# Altium PCB LSS-P-PCB-T v3.4.PcbDoc (part 2 of 6)
Units mil, origin at the board's own origin, x right, y up, seen from the top; angles counter-clockwise.
Board outline 2795.28 x 2795.28 mil, 4 copper layers (Top Layer, Power, Ground, Bottom Layer), stack 62.08 mil thick; 165 components, 120 nets, 586 pads, 623 vias.
Unrouted connection lines stored in the file: 2.
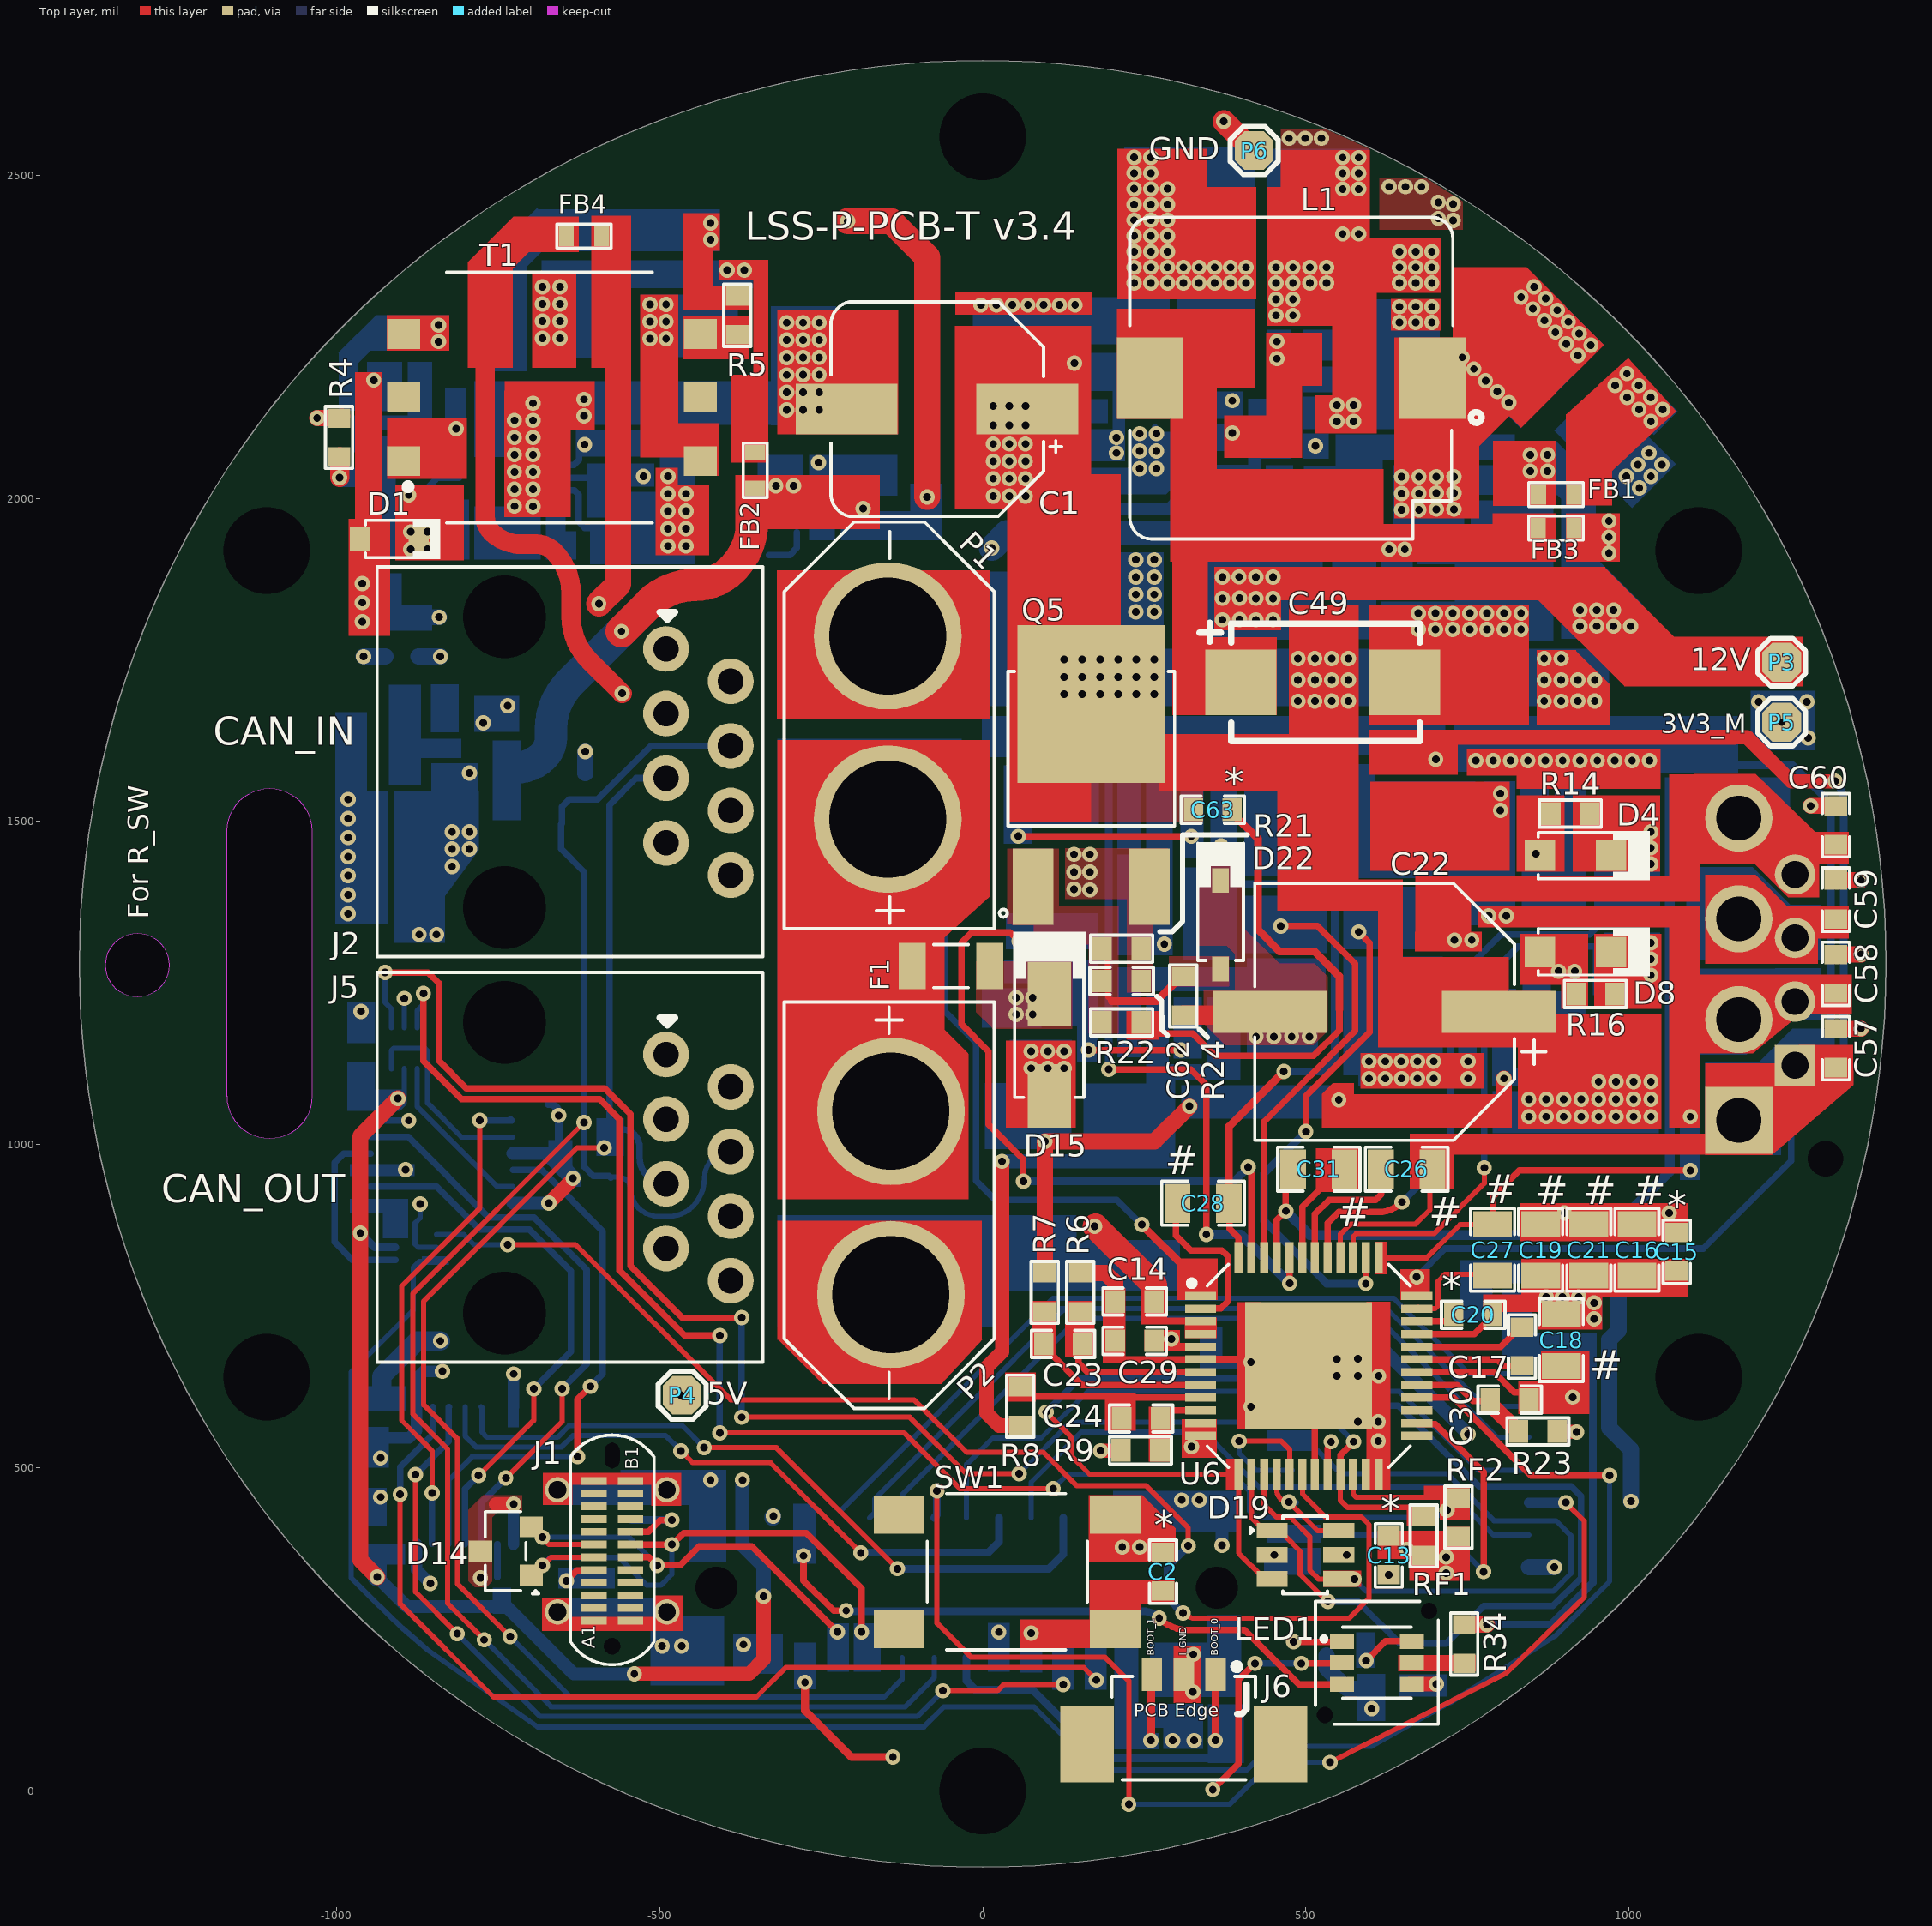
[diagram p0: Top Layer view]

## Part data (continued)
C30: library part UMK107B7474KA-TR, "CAP CER 0.47uF 50V X7R 0603", Capacitance=470nF, Case Code (Imperial)=0603, Case Code (Metric)=1608, Dielectric=X7R, Manufacturer="Taiyo Yuden", Max Operating Temperature=125°C, Min Operating Temperature=-55°C, Package Quantity=1, Supplier Part Number 1=587-3170-1-ND, Tolerance=10%, Voltage=50V, Case/Package=0603, Category="Ceramic Capacitors", ComponentLink1Description=https://datasheet.ciiva.com/30063/972umk107b7474ka-tr-30063804.pdf?src-supplier=Onlinecomponents.com, ComponentLink1URL=https://datasheet.ciiva.com/30063/972umk107b7474ka-tr-30063804.pdf?src-supplier=Onlinecomponents.com, ComponentLink2Description=https://datasheet.ciiva.com/11600/umk107b7474ka-tr-ss-11600367.pdf?src-supplier=Avnet, ComponentLink2URL=https://datasheet.ciiva.com/11600/umk107b7474ka-tr-ss-11600367.pdf?src-supplier=Avnet, ComponentLink3Description=https://datasheet.ciiva.com/15922/257umk107b7474ka-tr-15922607.pdf?src-supplier=Onlinecomponents.com, ComponentLink3URL=https://datasheet.ciiva.com/15922/257umk107b7474ka-tr-15922607.pdf?src-supplier=Onlinecomponents.com, ComponentLink4Description=https://datasheet.ciiva.com/6274/mlcc-all-e-6274710.pdf?src-supplier=Digi-Key, ComponentLink4URL=https://datasheet.ciiva.com/6274/mlcc-all-e-6274710.pdf?src-supplier=Digi-Key, ComponentLink5Description=https://datasheet.ciiva.com/5412/mlcc01-e-5412119.pdf?src-supplier=Mouser, ComponentLink5URL=https://datasheet.ciiva.com/5412/mlcc01-e-5412119.pdf?src-supplier=Mouser, ComponentLink6Description=https://datasheet.ciiva.com/6274/mlcc-all-e-6274712.pdf?src-supplier=Digi-Key, ComponentLink6URL=https://datasheet.ciiva.com/6274/mlcc-all-e-6274712.pdf?src-supplier=Digi-Key, ComponentLink7Description=https://datasheet.ciiva.com/6274/mlcc-all-e-6274713.pdf?src-supplier=Digi-Key, ComponentLink7URL=https://datasheet.ciiva.com/6274/mlcc-all-e-6274713.pdf?src-supplier=Digi-Key, Construction=Flat, Depth=0.8mm, Halogen Free="Halogen Free", Height=0.8mm, Lead Free="Lead Free", Length=1.6mm, Manufacturer Part Number=UMK107B7474KA-TR, Mount="Surface Mount", Packaging="Tape and Reel", Pricing 1="1=0.21000, 10=0.14800, 50=0.08400, 100=0.06950, 500=0.04876, 1000=0.04036 (USD)", Radiation Hardening=No, RoHS=Yes, RoHS Compliant=Yes, Series=M, Stock 1=81, Supplier 1=Digi-Key, Termination=SMD/SMT, Thickness=0.035inch, Voltage Rating=50V, Voltage Rating (DC)=50V, Width=0.031inch
C32: library part CL05B104KB54PNC, "CAP CER 0.1UF 50V X7R 0402", Manufacturer=Samsung, Supplier Part Number 1=1276-CL05B104KB54PNCDKR-ND, Manufacturer Part Number=CL05B104KB54PNC, Pricing 1="1=0.1, 10=0.067, 50=0.0366, 100=0.0299, 500=0.02138, 1000=0.01681, 2500=0.01528, 5000=0.01406 (USD)", Stock 1=8594, Supplier 1=Digi-Key
C33: library part CL10A475KA8NQNC, "CAP CER 4.7UF 25V X5R 0603", Capacitance=4.7uF, Case Code (Imperial)=0603, Case Code (Metric)=1608, Dielectric=X5R, Manufacturer=Samsung, Max Operating Temperature=85°C, Min Operating Temperature=-55°C, Package Quantity=1, Supplier Part Number 1=1276-1900-1-ND, Tolerance=10%, Voltage Rating=25V, Case/Package=0603, ComponentLink1Description=http://www.samsungsem.com/kr/support/product-search/mlcc/CL10A475KA8NQNC.jsp?src-supplier=Digi-Key, ComponentLink1URL=http://www.samsungsem.com/kr/support/product-search/mlcc/CL10A475KA8NQNC.jsp?src-supplier=Digi-Key, Contact Plating=Tin, Depth=0.8mm, Lead Free="Lead Free", Length=1.6mm, Manufacturer Part Number=CL10A475KA8NQNC, Mount="Surface Mount", Packaging="Tape and Reel", Pricing 1="1=0.37, 10=0.255, 100=0.1528, 500=0.11456, 1000=0.09675 (USD)", Stock 1=2252340, Supplier 1=Digi-Key, Termination=Wraparound, Thickness=0.035inch, Width=0.031inch
C36: library part 885012205080, "CAP CER 1000PF 100V X7R 0402", Manufacturer="Wurth Electronics", Supplier Part Number 1=732-12243-1-ND, ComponentLink1Description=https://katalog.we-online.de/pbs/datasheet/885012205080.pdf?src-supplier=Digi-Key, ComponentLink1URL=https://katalog.we-online.de/pbs/datasheet/885012205080.pdf?src-supplier=Digi-Key, Manufacturer Part Number=885012205080, Pricing 1="1=0.10000, 10=0.01900, 100=0.01730, 500=0.01532 (USD)", RoHS=Yes, Stock 1=13604, Supplier 1=Digi-Key
C37: library part CC0603KRX7R9BB222, "CAP CER 2200PF 50V X7R 0603", Case Code (Imperial)=0603, Case Code (Metric)=1608, Dielectric=X7R, Insulation Resistance=10GR, Manufacturer=Yageo, Max Operating Temperature=125°C, Min Operating Temperature=-55°C, Package Quantity=1, Resistor Type=Ceramic, Supplier Part Number 1=6169509, Tolerance=10%, Voltage=50V, Capacitance=2.2nF, Case/Package=0603, Category="Ceramic Capacitors", ComponentLink1Description=https://datasheet.ciiva.com/23768/1079489-23768004.pdf?src-supplier=Newark, ComponentLink1URL=https://datasheet.ciiva.com/23768/1079489-23768004.pdf?src-supplier=Newark, ComponentLink2Description=https://datasheet.ciiva.com/11788/0900766b8079c870-11788403.pdf?src-supplier=RSComponents, ComponentLink2URL=https://datasheet.ciiva.com/11788/0900766b8079c870-11788403.pdf?src-supplier=RSComponents, ComponentLink3Description=https://datasheet.ciiva.com/26862/getdatasheetpartid-403587-26862854.pdf?src-supplier=Verical, ComponentLink3URL=https://datasheet.ciiva.com/26862/getdatasheetpartid-403587-26862854.pdf?src-supplier=Verical, ComponentLink4Description=https://datasheet.ciiva.com/8033/70765-8033863.pdf?src-supplier=Element14, ComponentLink4URL=https://datasheet.ciiva.com/8033/70765-8033863.pdf?src-supplier=Element14, ComponentLink5Description=https://datasheet.ciiva.com/7978/1489800-7978172.pdf?src-supplier=Element14, ComponentLink5URL=https://datasheet.ciiva.com/7978/1489800-7978172.pdf?src-supplier=Element14, ComponentLink6Description=https://datasheet.ciiva.com/28450/1489800-28450632.pdf?src-supplier=Element14, ComponentLink6URL=https://datasheet.ciiva.com/28450/1489800-28450632.pdf?src-supplier=Element14, ComponentLink7Description=https://datasheet.ciiva.com/155/mlccorderingcode-155921.pdf?src-supplier=Digi-Key, ComponentLink7URL=https://datasheet.ciiva.com/155/mlccorderingcode-155921.pdf?src-supplier=Digi-Key, ComponentLink8Description=https://datasheet.ciiva.com/155/mlccorderingcode-155920.pdf?src-supplier=Digi-Key, ComponentLink8URL=https://datasheet.ciiva.com/155/mlccorderingcode-155920.pdf?src-supplier=Digi-Key, ComponentLink9Description=https://datasheet.ciiva.com/155/mlccorderingcode-155922.pdf?src-supplier=Digi-Key, ComponentLink9URL=https://datasheet.ciiva.com/155/mlccorderingcode-155922.pdf?src-supplier=Digi-Key, ComponentLink10Description=https://datasheet.ciiva.com/8033/1489800-8033864.pdf?src-supplier=Element14, ComponentLink10URL=https://datasheet.ciiva.com/8033/1489800-8033864.pdf?src-supplier=Element14, ComponentLink11Description=https://datasheet.ciiva.com/8033/1489800-8033862.pdf?src-supplier=Element14, ComponentLink11URL=https://datasheet.ciiva.com/8033/1489800-8033862.pdf?src-supplier=Element14, ComponentLink12Description=https://datasheet.ciiva.com/16625/upy-gphc-x7r-6-3v-to-50v-8-16625531.pdf?src-supplier=Avnet+Europe, ComponentLink12URL=https://datasheet.ciiva.com/16625/upy-gphc-x7r-6-3v-to-50v-8-16625531.pdf?src-supplier=Avnet+Europe, Depth=0.8mm, Dissipation Factor=2.5%, Halogen Free="Halogen Free", Height=0.8mm, Lead Free="Lead Free", Length=1.6mm, Manufacturer Part Number=CC0603KRX7R9BB222, Mount="Surface Mount", Number of Pins=2, Packaging="Tape and Reel", Pricing 1="4000=0.00500 (USD)", Radiation Hardening=No, REACH SVHC="No SVHC", RoHS=Yes, RoHS Compliant=Yes, Series=CC, Stock 1=1, Supplier 1=RSComponents, Termination=SMD/SMT, Thickness=0.035inch, Voltage Rating=50V, Voltage Rating (DC)=50V, Width=0.031inch
C38: library part GRM155R62A104KE14D, "CAP CER 0.1UF 100V X5R 0402", Capacitance=100nF, Case Code (Imperial)=0402, Case Code (Metric)=1005, Dielectric=X5R, LCSC Part Number=C162178, Manufacturer=Murata, Max Operating Temperature=85°C, Min Operating Temperature=-55°C, Package Quantity=10000, Tolerance=10%, Voltage Rating=100V, Case/Package=0402, Category="Ceramic Capacitors", ComponentLink1Description=http://www.farnell.com/datasheets/2079151.pdf?src-supplier=Farnell, ComponentLink1URL=http://www.farnell.com/datasheets/2079151.pdf?src-supplier=Farnell, ComponentLink2Description=http://www.mouser.com/ds/2/281/c02e-2905.pdf?src-supplier=Mouser, ComponentLink2URL=http://www.mouser.com/ds/2/281/c02e-2905.pdf?src-supplier=Mouser, ComponentLink3Description=http://www.farnell.com/datasheets/2079151.pdf?src-supplier=Element14, ComponentLink3URL=http://www.farnell.com/datasheets/2079151.pdf?src-supplier=Element14, ComponentLink4Description=http://search.murata.co.jp/Ceramy/image/img/A01X/G101/ENG/GRM155R62A104KE14-01.pdf?src-supplier=Digi-Key, ComponentLink4URL=http://search.murata.co.jp/Ceramy/image/img/A01X/G101/ENG/GRM155R62A104KE14-01.pdf?src-supplier=Digi-Key, ComponentLink5Description=http://www.farnell.com/datasheets/2079151.pdf?src-supplier=Newark, ComponentLink5URL=http://www.farnell.com/datasheets/2079151.pdf?src-supplier=Newark, Height=0.5mm, Item Type=Capacitor, Lead Free="Lead Free", Length=0.039inch, Manufacturer Part Number=GRM155R62A104KE14D, Mount="Surface Mount", Packaging="Tape and Reel", Pricing 1="10000=0.00500, 20000=0.00410, 30000=0.00390, 50000=0.00370, 100000=0.00300 (USD)", Reach SVHC Compliant=Yes, RoHS=Yes, RoHS Compliant=Yes, Series=GRM, Stock 1=870000, Supplier 1="Arrow Electronics", Supplier Part Number 1=GRM155R62A104KE14D, Termination=SMD/SMT, Thickness=0.022inch, Voltage Rating (DC)=100V, Weight=0.000212oz, Width=0.02inch
C39: library part C1608X5R1E106M080AC, "CAP CER 10UF 25V X5R 0603", Case Code (Imperial)=0603, Case Code (Metric)=1608, Dielectric=X5R, Dielectric Material=Ceramic, LCSC Part Number=C2168289, Manufacturer=TDK, Max Operating Temperature=85°C, Min Operating Temperature=-55°C, Package Quantity=1, Supplier Part Number 1=445-9015-1-ND, Tolerance=20%, Voltage Rating=25V, Capacitance=10uF, Case/Package=0603, Composition=Ceramic, Depth=0.8mm, Height=0.8mm, Item Type=Capacitor, Lead Free="Lead Free", Length=1.6mm, Manufacturer Part Number=C1608X5R1E106M080AC, Mount="Surface Mount", Packaging="Tape and Reel", Pricing 1="1=0.96, 10=0.704, 100=0.483, 500=0.38238, 1000=0.322 (USD)", REACH SVHC="No SVHC", Stock 1=61681, Supplier 1=Digi-Key, Termination=SMD/SMT, Thickness=0.039inch, Voltage Rating (DC)=25V, Weight=7.1E-05oz, Width=0.8mm
C42: library part 0603B682K500NT, "50V 6.8nF X7R ±10% 0603", Manufacturer=FH, ComponentLink1Description=LCSC, ComponentLink1URL=https://www.lcsc.com/product-detail/Multilayer-Ceramic-Capacitors-MLCC-SMD-SMT_FH-Guangdong-Fenghua-Advanced-Tech-0603B682K500NT_C1631.html, Manufacturer Part Number=0603B682K500NT
C43: library part GRM31CR61E476ME44L, "CAP CER 1206 47 uF 25 V ±20 % Tol. X5R", Dielectric=X5R, Manufacturer=Murata, Supplier Part Number 1=490-16268-2-ND, Tolerance=20%, Voltage Rating (DC)=25V, Capacitance=47uF, Category="Ceramic Capacitors", ComponentLink1Description=https://search.murata.co.jp/Ceramy/image/img/A01X/partnumbering_e_01.pdf?src-supplier=Digi-Key, ComponentLink1URL=https://search.murata.co.jp/Ceramy/image/img/A01X/partnumbering_e_01.pdf?src-supplier=Digi-Key, Length=3.2mm, Manufacturer Part Number=GRM31CR61E476ME44L, RoHS=Yes, Supplier 1=Digi-Key, Thickness=1.6mm, Width=1.6mm
C44 C45: library part C2012X5R1V226MT000E, "CAP CER 22UF 35V X5R 0805", LCSC Part Number=C338080, Manufacturer="TDK Corporation", Package=0805, ComponentLink1Description=LCSC, ComponentLink1URL=https://www.lcsc.com/product-detail/Multilayer-Ceramic-Capacitors-MLCC-SMD-SMT_TDK-C2012X5R1V226M125AC_C2179409.html, Item Type=Capacitor, Manufacturer Part Number=C2012X5R1V226MT000E
C48 C49: library part TAJE107M025RNJ, "CAP TANT 100UF 20% 25V 2917", Case Code (Imperial)=2917, Case Code (Metric)=7343, ESR (Equivalent Series Resistance)=300mR, Leakage Current=25uA, Manufacturer="Kyocera AVX", Max Operating Temperature=125°C, Min Operating Temperature=-55°C, Package Quantity=1, Supplier Part Number 1=581-TAJE107M025RNJ, Tolerance=20%, Voltage Rating=25V, Capacitance=100uF, Case/Package=2917, Category="Tantalum Capacitors", ComponentLink1Description=https://datasheet.ciiva.com/26787/taje107m025rnj-26787048.pdf?src-supplier=IIIC, ComponentLink1URL=https://datasheet.ciiva.com/26787/taje107m025rnj-26787048.pdf?src-supplier=IIIC, ComponentLink2Description=https://datasheet.ciiva.com/265/taj-265541.pdf?src-supplier=Digi-Key, ComponentLink2URL=https://datasheet.ciiva.com/265/taj-265541.pdf?src-supplier=Digi-Key, ComponentLink3Description=https://datasheet.ciiva.com/265/taj-265542.pdf?src-supplier=Digi-Key, ComponentLink3URL=https://datasheet.ciiva.com/265/taj-265542.pdf?src-supplier=Digi-Key, ComponentLink4Description=https://datasheet.ciiva.com/265/taj-265540.pdf?src-supplier=Digi-Key, ComponentLink4URL=https://datasheet.ciiva.com/265/taj-265540.pdf?src-supplier=Digi-Key, ComponentLink5Description=https://datasheet.ciiva.com/28609/1719052-28609254.pdf?src-supplier=Element14, ComponentLink5URL=https://datasheet.ciiva.com/28609/1719052-28609254.pdf?src-supplier=Element14, ComponentLink6Description=https://datasheet.ciiva.com/11230/taj-11230456.pdf?src-supplier=Avnet, ComponentLink6URL=https://datasheet.ciiva.com/11230/taj-11230456.pdf?src-supplier=Avnet, ComponentLink7Description=https://datasheet.ciiva.com/17339/taj-17339677.pdf?src-supplier=Avnet+Europe, ComponentLink7URL=https://datasheet.ciiva.com/17339/taj-17339677.pdf?src-supplier=Avnet+Europe, ComponentLink8Description=https://datasheet.ciiva.com/22667/1719052-22667581.pdf?src-supplier=Element14, ComponentLink8URL=https://datasheet.ciiva.com/22667/1719052-22667581.pdf?src-supplier=Element14, Construction=Flat, Depth=4.3mm, Dissipation Factor=10%, Features="General Purpose", Height=4.3mm, Height - Seated (Max)=0.169inch, Lead Free="Lead Free", Length=7.3mm, Manufacturer Part Number=TAJE107M025RNJ, Mount="Surface Mount", Number of Pins=2, Packaging="Tape and Reel", Polarity=Polar, Pricing 1="1=2.81000, 10=2.81000, 50=2.81000, 100=2.19000, 1000=1.76000, 10000=1.76000 (USD)", Radiation Hardening=No, REACH SVHC="No SVHC", RoHS=Yes, RoHS Compliant=Yes, Series=TAJ, Stock 1=109, Supplier 1=Mouser, Termination=SMD/SMT, Voltage Rating (DC)=25V, Width=4.3mm
C50: library part CC0603KRX7R9BB471, "CAP CER 470pF 10% X7R 50V 0603 SMD", Case Code (Imperial)=0603, Case Code (Metric)=1608, Dielectric=X7R, Dielectric Material=Ceramic, Insulation Resistance=10GR, Manufacturer=Yageo, Max Operating Temperature=125°C, Min Operating Temperature=-55°C, Package Quantity=1, Supplier Part Number 1=311-1078-1-ND, Tolerance=10%, Voltage Rating=50V, Capacitance=470pF, Case/Package=0603, Category="Ceramic Capacitors", ComponentLink1Description=https://datasheet.ciiva.com/5425/upy-gphc-x7r-6-3v-to-50v-8-12304-5425461.pdf?src-supplier=Mouser, ComponentLink1URL=https://datasheet.ciiva.com/5425/upy-gphc-x7r-6-3v-to-50v-8-12304-5425461.pdf?src-supplier=Mouser, ComponentLink2Description=https://datasheet.ciiva.com/144/mlccorderingcode-144439.pdf?src-supplier=Digi-Key, ComponentLink2URL=https://datasheet.ciiva.com/144/mlccorderingcode-144439.pdf?src-supplier=Digi-Key, ComponentLink3Description=https://datasheet.ciiva.com/144/mlccorderingcode-144440.pdf?src-supplier=Digi-Key, ComponentLink3URL=https://datasheet.ciiva.com/144/mlccorderingcode-144440.pdf?src-supplier=Digi-Key, ComponentLink4Description=https://datasheet.ciiva.com/11587/upy-gphc-x7r-6-3v-to-50v-8-11587224.pdf?src-supplier=Avnet, ComponentLink4URL=https://datasheet.ciiva.com/11587/upy-gphc-x7r-6-3v-to-50v-8-11587224.pdf?src-supplier=Avnet, ComponentLink5Description=https://datasheet.ciiva.com/144/mlccorderingcode-144441.pdf?src-supplier=Digi-Key, ComponentLink5URL=https://datasheet.ciiva.com/144/mlccorderingcode-144441.pdf?src-supplier=Digi-Key, ComponentLink6Description=https://datasheet.ciiva.com/16623/upy-gphc-x7r-6-3v-to-50v-8-16623897.pdf?src-supplier=Avnet+Europe, ComponentLink6URL=https://datasheet.ciiva.com/16623/upy-gphc-x7r-6-3v-to-50v-8-16623897.pdf?src-supplier=Avnet+Europe, ComponentLink7Description=https://datasheet.ciiva.com/8033/1489800-8033898.pdf?src-supplier=Element14, ComponentLink7URL=https://datasheet.ciiva.com/8033/1489800-8033898.pdf?src-supplier=Element14, ComponentLink8Description=https://datasheet.ciiva.com/8033/1489800-8033899.pdf?src-supplier=Element14, ComponentLink8URL=https://datasheet.ciiva.com/8033/1489800-8033899.pdf?src-supplier=Element14, ComponentLink9Description=https://datasheet.ciiva.com/26829/getdatasheetpartid-251791-26829452.pdf?src-supplier=Verical, ComponentLink9URL=https://datasheet.ciiva.com/26829/getdatasheetpartid-251791-26829452.pdf?src-supplier=Verical, ComponentLink10Description=https://datasheet.ciiva.com/28450/1489800-28450652.pdf?src-supplier=Element14, ComponentLink10URL=https://datasheet.ciiva.com/28450/1489800-28450652.pdf?src-supplier=Element14, ComponentLink11Description=https://datasheet.ciiva.com/8033/70765-8033902.pdf?src-supplier=Element14, ComponentLink11URL=https://datasheet.ciiva.com/8033/70765-8033902.pdf?src-supplier=Element14, Depth=0.8mm, Dissipation Factor=2.5%, Halogen Free="Halogen Free", Height=0.8mm, Lead Free="Lead Free", Length=1.6mm, Manufacturer Part Number=CC0603KRX7R9BB471, Mount="Surface Mount", Number of Pins=2, Packaging="Tape and Reel", Pricing 1="1=0.10000, 10=0.04500, 50=0.02460, 100=0.02010, 500=0.01432, 1000=0.01125 (USD)", Radiation Hardening=No, REACH SVHC="No SVHC", Resistor Type=Ceramic, RoHS=Yes, RoHS Compliant=Yes, Series=CC, Stock 1=2173, Supplier 1=Digi-Key, Termination=SMD/SMT, Thickness=0.035inch, Voltage Rating (DC)=50V, Width=0.8mm
C57 C58 C59 C60: library part CL10B102KC8NNNC, "CAP CER 1nF 100V X7R 0603", Case Code (Imperial)=0603, Case Code (Metric)=1608, Dielectric=X7R, Manufacturer=Samsung, Max Operating Temperature=125°C, Min Operating Temperature=-55°C, Package Quantity=1, Tolerance=10%, Voltage=100V, Capacitance=1nF, Case/Package=0603, Category="Ceramic Capacitors", ComponentLink1Description=https://datasheet.ciiva.com/25799/cl10b102kc8nnnc-25799476.pdf?src-supplier=Digi-Key, ComponentLink1URL=https://datasheet.ciiva.com/25799/cl10b102kc8nnnc-25799476.pdf?src-supplier=Digi-Key, ComponentLink2Description=https://datasheet.ciiva.com/29198/458286-da-01-en-vs-kondensator-0603-29198496.pdf?src-supplier=Conrad, ComponentLink2URL=https://datasheet.ciiva.com/29198/458286-da-01-en-vs-kondensator-0603-29198496.pdf?src-supplier=Conrad, ComponentLink3Description=https://datasheet.ciiva.com/26838/getdatasheetpartid-640779-26838395.pdf?src-supplier=Verical, ComponentLink3URL=https://datasheet.ciiva.com/26838/getdatasheetpartid-640779-26838395.pdf?src-supplier=Verical, ComponentLink4Description=https://datasheet.ciiva.com/26310/mlcc-catalogdownload2013-eng-26310266.pdf?src-supplier=Distrelec, ComponentLink4URL=https://datasheet.ciiva.com/26310/mlcc-catalogdownload2013-eng-26310266.pdf?src-supplier=Distrelec, ComponentLink5Description=https://datasheet.ciiva.com/16199/cl05b104kq5nnnc-16199246.pdf?src-supplier=Future+Electronics, ComponentLink5URL=https://datasheet.ciiva.com/16199/cl05b104kq5nnnc-16199246.pdf?src-supplier=Future+Electronics, Construction=Flat, Contact Plating=Tin, Depth=0.8mm, Height=0.8mm, Lead Free="Lead Free", Length=1.6mm, Manufacturer Part Number=CL10B102KC8NNNC, Material=Ceramic, Mount="Surface Mount", Packaging="Tape and Reel", Pricing 1="4000=0.00988, 8000=0.00987, 16000=0.00986, 24000=0.00985, 32000=0.00984, 40000=0.00982, 400000=0.00981 (USD)", Radiation Hardening=No, RoHS=Yes, RoHS Compliant=Yes, Series=CL, Stock 1=184000, Supplier 1=Avnet, Supplier Part Number 1=CL10B102KC8NNNC, Thickness=0.035inch, Voltage Rating=100V, Voltage Rating (DC)=100V, Width=0.031inch
D1: "Diode Schottky 30V 1A Surface Mount USC", Average Rectified Current=1A, Case/Package=SOD, Manufacturer=Toshiba, Max Operating Temperature=125°C, Max Reverse Current=500uA, Max Reverse Voltage (DC)=30V, Min Operating Temperature=-55°C, Peak Non-Repetitive Surge Current=5A, Category="Rectifier Diodes", ComponentLink1Description=https://toshiba.semicon-storage.com/info/docget.jsp?did=14077&prodName=CUS10S30&src-supplier=Digi-Key, ComponentLink1URL=https://toshiba.semicon-storage.com/info/docget.jsp?did=14077&prodName=CUS10S30&src-supplier=Digi-Key, ComponentLink2Description=http://toshiba.semicon-storage.com/info/docget.jsp?did=14077&prodName=CUS10S30&src-supplier=Avnet, ComponentLink2URL=http://toshiba.semicon-storage.com/info/docget.jsp?did=14077&prodName=CUS10S30&src-supplier=Avnet, ComponentLink3Description=http://toshiba.semicon-storage.com/info/lookup.jsp?pid=CUS10S30&amp;lang=en&src-supplier=Mouser, ComponentLink3URL=http://toshiba.semicon-storage.com/info/lookup.jsp?pid=CUS10S30&amp;lang=en&src-supplier=Mouser, Contact Plating=Tin,Silver, Element Configuration=Single, Manufacturer Part Number=CUS10S30,H3F, Mount="Surface Mount", Number of Pins=2, Packaging="Cut Tape", Pricing 1="3000=0.04896, 6000=0.04768, 12000=0.04544, 18000=0.04416, 24000=0.04320, 30000=0.04192, 300000=0.04096 (USD)", RoHS=Yes, RoHS Compliant=No, Stock 1=9000, Supplier 1=Avnet, Supplier Part Number 1=CUS10S30,H3F
D2: "500μA@100V 100V Single 600mV@1A 1A SMA Schottky Barrier Diodes (SBD) ROHS", Manufacturer=Yangzhou, Package=SMA, Manufacturer Part No=SSL110A
D3 DF2: "40V 500mV@2A 2A SMA(DO-214AC) Schottky Barrier Diodes (SBD) ROHS", Manufacturer=Yangzhou, Package=SMA(DO-214AC), Manufacturer Part No=SS24A
D4 D5 D6 D7 D8 D9 D10 D11: "DIODE SCHOTTKY 30V 1A SOD123F", Manufacturer=TOSHIBA, Manufacturer Part Number=CRS01(TE85L,Q,M), Stock 1=72983, Supplier 1=Digi-Key
D12 D13: "TVS DIODE 24VWM 41VC TO236AB", Manufacturer=Nexperia, Category="ESD and Circuit Protection ICs", ComponentLink1Description=http://www.farnell.com/datasheets/1750978.pdf?src-supplier=Farnell, ComponentLink1URL=http://www.farnell.com/datasheets/1750978.pdf?src-supplier=Farnell, ComponentLink2Description=https://assets.nexperia.com/documents/data-sheet/PESD2CAN.pdf?src-supplier=Digi-Key, ComponentLink2URL=https://assets.nexperia.com/documents/data-sheet/PESD2CAN.pdf?src-supplier=Digi-Key, ComponentLink3Description=http://www.farnell.com/datasheets/1750978.pdf?src-supplier=Newark, ComponentLink3URL=http://www.farnell.com/datasheets/1750978.pdf?src-supplier=Newark, Manufacturer Part Number=PESD2CAN,215, Pricing 1="1=0.48690, 10=0.40120, 25=0.38650, 50=0.33780, 100=0.25440, 250=0.25380, 500=0.25120 (USD)", RoHS=No, Stock 1=775, Supplier 1="Arrow Electronics", Supplier Part Number 1=PESD2CAN,215
D14: "16A 20V 7V 5V@Max Unidirectional SOT-23 TVS ROHS", LCSC Part Number=C239643, Manufacturer=WILLSEMI, Package=SOT-23, ComponentLink1Description=LCSC, ComponentLink1URL=https://www.lcsc.com/product-detail/TVS_WILLSEMI-Will-Semicon-ESD5302F-3-TR_C239643.html, Item Type=Diode, Manufacturer Part Number=ESD5302F-3/TR
D15: "TVS DIODE 48VWM 77.4VC DO214AC", Breakdown Voltage=53.3V, Case/Package=DO-214AC, Clamping Voltage=77.4V, LCSC Part Number=C223991, Leakage Current=1uA, Manufacturer=Littelfuse, Max Breakdown Voltage=58.9V, Max Operating Temperature=150°C, Max Power Dissipation=3.3W, Max Surge Current=5.2A, Min Operating Temperature=-65°C, Operating Supply Voltage=48V, Package=SMA(DO-214AC), Package Quantity=5000, Peak Pulse Power=400W, Power Line Protection=No, Supplier Part Number=1719659, Test Current=1mA, Category="TVS Diodes", Clamping Voltage-Max=77.4V, ComponentLink1Description=LCSC, ComponentLink2Description=https://datasheet.ciiva.com/28649/607617-28649159.pdf?src-supplier=Element14, ComponentLink2URL=https://datasheet.ciiva.com/28649/607617-28649159.pdf?src-supplier=Element14, ComponentLink3Description=https://datasheet.ciiva.com/16391/littelfuse-tvs-diode-smaj-16391798.pdf?src-supplier=Future+Electronics, ComponentLink3URL=https://datasheet.ciiva.com/16391/littelfuse-tvs-diode-smaj-16391798.pdf?src-supplier=Future+Electronics, ComponentLink4Description=https://datasheet.ciiva.com/330/littelfuse-tvs-diode-smaj-datasheet-pdf-330802.pdf?src-supplier=Digi-Key, ComponentLink4URL=https://datasheet.ciiva.com/330/littelfuse-tvs-diode-smaj-datasheet-pdf-330802.pdf?src-supplier=Digi-Key, ComponentLink5Description=https://datasheet.ciiva.com/330/littelfuse-tvs-diode-smaj-datasheet-pdf-330803.pdf?src-supplier=Digi-Key, ComponentLink5URL=https://datasheet.ciiva.com/330/littelfuse-tvs-diode-smaj-datasheet-pdf-330803.pdf?src-supplier=Digi-Key, ComponentLink6Description=https://datasheet.ciiva.com/330/littelfuse-tvs-diode-smaj-datasheet-pdf-330804.pdf?src-supplier=Digi-Key, ComponentLink6URL=https://datasheet.ciiva.com/330/littelfuse-tvs-diode-smaj-datasheet-pdf-330804.pdf?src-supplier=Digi-Key, Diode Type=ZENER, Direction=Unidirectional, Height=2.29mm, Item Type="TVS  Diode", Lead Free="Lead Free", Length=5.28mm, Manufacturer Part Number=SMAJ48A, Min Breakdown Voltage=53.3V, Mounting Technology="Surface Mount", Number of Channels=1, Number of Elements=1, Number of Unidirectional Channels=1, Packaging="Tape and Reel", Peak Pulse Current=5.2A, Pins=2, Polarity=Unidirectional, Power Dissipation=400W, Pricing="25=0.231, 100=0.214, 500=0.209, 1000=0.204 (GBP)", Reach SVHC Compliant=No, Reverse Breakdown Voltage=53.3V, Reverse Standoff Voltage=48V, RoHS=Yes, RoHS Compliant=Yes, Series=SMAJ, Stock=2975, Supplier=Rs, Termination=SMD/SMT, Voltage Rating (DC)=48V, Width=2.79mm
D16 D18: "TVS DIODE 3.3VWM 11.5VC MICROSMP", Breakdown Voltage=4.1V, Clamping Voltage=11V, LCSC Part Number=C241899, Max Operating Temperature=150°C, Max Reverse Leakage Current=200uA, Max Surge Current=75A, Min Operating Temperature=-55°C, Operating Supply Voltage=3.3V, Package Quantity=4500, Peak Pulse Current=87A, Peak Pulse Power=150W, Power Line Protection=No, Supplier Part Number=625-MSP3V3HM3, Test Current=1mA, Category="TVS Diodes", ComponentLink1Description=LCSC, ComponentLink2Description=https://datasheet.ciiva.com/14080/msp3v3-14080471.pdf?src-supplier=Digi-Key, ComponentLink2URL=https://datasheet.ciiva.com/14080/msp3v3-14080471.pdf?src-supplier=Digi-Key, Diode Type=ZENER, Direction=Unidirectional, Item Type="TVS Diode", Min Breakdown Voltage=4.1V, Mounting Technology="Surface Mount", Number of Unidirectional Channels=1, Packaging="Tape and Reel", Polarity=Unidirectional, Pricing="1=0.39, 10=0.313, 50=0.313, 100=0.165, 1000=0.068, 10000=0.05 (USD)", Reverse Standoff Voltage=3.3V, RoHS=Yes, RoHS Compliant=Yes, Series="Automotive, AEC-Q101, TransZorb®, eSMP™", Stock=15021, Supplier=Mouser
D17: "TVS DIODE 12VWM 19.9VC MICROSMP", LCSC Part Number=C1973858, Max Operating Temperature=150°C, Min Breakdown Voltage=13.3V, Min Operating Temperature=-55°C, Peak Pulse Current=7.5A, Peak Pulse Power=150W, Power Line Protection=No, Reverse Standoff Voltage=12V, Supplier Part Number=78-MSMP12A-M389A, Category="TVS Diodes", ComponentLink1Description=LCSC, ComponentLink2Description=http://www.vishay.com/docs/89457/mspm6a.pdf?src-supplier=Digi-Key, ComponentLink2URL=http://www.vishay.com/docs/89457/mspm6a.pdf?src-supplier=Digi-Key, ComponentLink3Description=http://www.vishay.com/docs/89457/msmp6athrumsmp20a.pdf?src-supplier=Digi-Key, ComponentLink3URL=http://www.vishay.com/docs/89457/msmp6athrumsmp20a.pdf?src-supplier=Digi-Key, Diode Type=ZENER, Item Type="TVS Diode", Mounting Technology="Surface Mount", Number of Unidirectional Channels=1, Packaging="Tape and Reel", Pricing="1=0.36, 10=0.294, 50=0.294, 100=0.118, 1000=0.069, 10000=0.048 (USD)", RoHS=Yes, RoHS Compliant=Yes, Series=TransZorb®, Stock=17037, Supplier=Mouser
D19: "TVS DIODE 5.25VWM 17VC SOT23-6", Breakdown Voltage=6V, Case/Package=SOT-23, Clamping Voltage=17V, LCSC Part Number=C111212, Leakage Current=150nA, Max Breakdown Voltage=10V, Max Operating Temperature=125°C, Max Reverse Leakage Current=2uA, Min Operating Temperature=-40°C, Operating Supply Voltage=860mV, Peak Pulse Current=5A, Power Line Protection=Yes, Reverse Standoff Voltage=5V, Supplier Part Number=511-USBLC6-4SC6, Test Current=1mA, Category="TVS Diodes", Clamping Voltage-Max=17V, ComponentLink1Description=LCSC, ComponentLink2Description=https://datasheet.ciiva.com/14186/usblc6-4-st-eng-tds-14186570.pdf?src-supplier=Distrelec, ComponentLink2URL=https://datasheet.ciiva.com/14186/usblc6-4-st-eng-tds-14186570.pdf?src-supplier=Distrelec, ComponentLink3Description=https://datasheet.ciiva.com/27052/1493951-27052291.pdf?src-supplier=Jameco, ComponentLink3URL=https://datasheet.ciiva.com/27052/1493951-27052291.pdf?src-supplier=Jameco, ComponentLink4Description=https://datasheet.ciiva.com/1220/48344-1220005.pdf?src-supplier=Newark, ComponentLink4URL=https://datasheet.ciiva.com/1220/48344-1220005.pdf?src-supplier=Newark, ComponentLink5Description=https://datasheet.ciiva.com/4507/cd00047494-112581-4507757.pdf?src-supplier=Mouser, ComponentLink5URL=https://datasheet.ciiva.com/4507/cd00047494-112581-4507757.pdf?src-supplier=Mouser, ComponentLink6Description=https://datasheet.ciiva.com/16206/cd00047494-16206119.pdf?src-supplier=Future+Electronics, ComponentLink6URL=https://datasheet.ciiva.com/16206/cd00047494-16206119.pdf?src-supplier=Future+Electronics, ComponentLink7Description=https://datasheet.ciiva.com/15143/getdatasheetpartid-88767-15143364.pdf?src-supplier=Verical, ComponentLink7URL=https://datasheet.ciiva.com/15143/getdatasheetpartid-88767-15143364.pdf?src-supplier=Verical, ComponentLink8Description=https://datasheet.ciiva.com/22685/1498406-22685833.pdf?src-supplier=Element14, ComponentLink8URL=https://datasheet.ciiva.com/22685/1498406-22685833.pdf?src-supplier=Element14, ComponentLink9Description=https://datasheet.ciiva.com/22692/1498406-22692454.pdf?src-supplier=Element14, ComponentLink9URL=https://datasheet.ciiva.com/22692/1498406-22692454.pdf?src-supplier=Element14, Depth=1.75mm, Direction=Unidirectional, ESD Protection=Yes, Height=1.3mm, Item Type="ESD Diode", Lead Free="Lead Free", Length=3.05mm, Min Breakdown Voltage=6V, Mounting Technology="Surface Mount", Number of Channels=4, Number of Elements=1, Number of Unidirectional Channels=4, Packaging="Tape and Reel", Pins=6, Polarity=Unidirectional,Bidirectional, Pricing="1=0.58, 10=0.512, 50=0.512, 100=0.381, 1000=0.271, 10000=0.211 (USD)", Radiation Hardening=No, Reach SVHC Compliant=No, Reverse Breakdown Voltage=6V, RoHS=Yes, RoHS Compliant=Yes, Series=USB, Stock=148069, Supplier=Mouser, Termination=SMD/SMT, Voltage Rating (DC)=5V, Width=1.75mm, Working Voltage=5V
D20 D21: "TVS DIODE 5.25VWM 17VC SOT666", Breakdown Voltage=6V, Case/Package=SOT-666, Clamping Voltage=17V, LCSC Part Number=C15999, Leakage Current=150nA, Max Operating Temperature=125°C, Max Repetitive Reverse Voltage (Vrrm)=5.25V, Min Operating Temperature=-40°C, Operating Supply Voltage=5V, Package Quantity=1, Peak Pulse Current=5A, Power Line Protection=Yes, Supplier Part Number=511-USBLC6-2P6, Test Current=1mA, Category="TVS Diodes", Clamping Voltage-Max=17V, ComponentLink1Description=LCSC, ComponentLink2Description=https://datasheet.ciiva.com/14186/usblc6-2-st-eng-tds-14186568.pdf?src-supplier=Distrelec, ComponentLink2URL=https://datasheet.ciiva.com/14186/usblc6-2-st-eng-tds-14186568.pdf?src-supplier=Distrelec, ComponentLink3Description=https://datasheet.ciiva.com/15143/getdatasheetpartid-98673-15143462.pdf?src-supplier=Verical, ComponentLink3URL=https://datasheet.ciiva.com/15143/getdatasheetpartid-98673-15143462.pdf?src-supplier=Verical, ComponentLink4Description=https://datasheet.ciiva.com/22685/1690354-22685832.pdf?src-supplier=Element14, ComponentLink4URL=https://datasheet.ciiva.com/22685/1690354-22685832.pdf?src-supplier=Element14, ComponentLink5Description=https://datasheet.ciiva.com/22692/1690354-22692453.pdf?src-supplier=Element14, ComponentLink5URL=https://datasheet.ciiva.com/22692/1690354-22692453.pdf?src-supplier=Element14, ComponentLink6Description=https://datasheet.ciiva.com/4508/cd00050750-4508892.pdf?src-supplier=Mouser, ComponentLink6URL=https://datasheet.ciiva.com/4508/cd00050750-4508892.pdf?src-supplier=Mouser, ComponentLink7Description=https://datasheet.ciiva.com/16378/cd00050750-16378714.pdf?src-supplier=Future+Electronics, ComponentLink7URL=https://datasheet.ciiva.com/16378/cd00050750-16378714.pdf?src-supplier=Future+Electronics, ComponentLink8Description=https://datasheet.ciiva.com/41444/001184108-da-01-en-ic-esd-protection-usblc6-2p6-sot-666-stm-41444134.pdf?src-supplier=Conrad, ComponentLink8URL=https://datasheet.ciiva.com/41444/001184108-da-01-en-ic-esd-protection-usblc6-2p6-sot-666-stm-41444134.pdf?src-supplier=Conrad, Depth=1.3mm, Direction=Unidirectional,Bidirectional, ESD Protection=Yes, Height=0.6mm, Item Type="ESD Diode", Lead Free="Lead Free", Length=1.7mm, Max Breakdown Voltage=6V, Max Reverse Leakage Current=150nA, Min Breakdown Voltage=6V, Mounting Technology="Surface Mount", Number of Bidirectional Channels=2, Number of Channels=2, Number of Elements=1, Number of Unidirectional Channels=2, Packaging="Tape and Reel", Pins=6, Polarity=Unidirectional,Bidirectional, Pricing="1=0.59, 10=0.514, 50=0.514, 100=0.356, 1000=0.253, 10000=0.197 (USD)", Radiation Hardening=No, Reach SVHC Compliant=No, Reverse Breakdown Voltage=6V, Reverse Standoff Voltage=5V, RoHS=Yes, RoHS Compliant=Yes, Series=USB, Stock=180020, Supplier=Mouser, Termination=SMD/SMT, Width=1.3mm, Working Voltage=5V
D22: "±5% Single 15.3V~17.1V 500mW 16V SOD-123 Zener Diodes ROHS", LCSC Part Number=C216724, Manufacturer=Shikues, Package=SOD-123, ComponentLink1Description=LCSC, ComponentLink1URL=https://www.lcsc.com/product-detail/Zener-Diodes_Shikues-BZT52C16_C216724.html, Item Type="Zener Diode", Manufacturer Part Number=BZT52C16
F1: "FUSE BOARD MNT 15A 125VAC 32VDC", Case Code (Imperial)=1206, Case Code (Metric)=3216, Current Rating=15A, DC Cold Resistance=2.6mR, Manufacturer=Bel, Max Operating Temperature=125°C, Min Operating Temperature=-55°C, Supplier Part Number 1=507-1944-1-ND, Voltage Rating (AC)=125V, Voltage Rating (DC)=32V, Approvals=cURus, Case/Package=1206, Category=Fuses, ComponentLink1Description=http://www.farnell.com/datasheets/2571626.pdf?src-supplier=Farnell, ComponentLink1URL=http://www.farnell.com/datasheets/2571626.pdf?src-supplier=Farnell, ComponentLink2Description=http://www.farnell.com/datasheets/2571626.pdf?src-supplier=Newark, ComponentLink2URL=http://www.farnell.com/datasheets/2571626.pdf?src-supplier=Newark, ComponentLink3Description=https://belfuse.com/resources/datasheets/circuitprotection/ds-cp-c1h-series.pdf?src-supplier=Digi-Key, ComponentLink3URL=https://belfuse.com/resources/datasheets/circuitprotection/ds-cp-c1h-series.pdf?src-supplier=Digi-Key, Fuse Type="Board Mount (Cartridge Style Excluded)", Manufacturer Part Number=0685H9150-01, Mount="Surface Mount", Packaging="Tape and Reel", Pricing 1="1=0.29000, 5=0.27800, 10=0.26600, 50=0.23780, 100=0.22140, 250=0.19680, 500=0.16400, 1000=0.15580 (USD)", RoHS=Yes, RoHS Compliant=Yes, Stock 1=31788, Supplier 1=Digi-Key
FB1 FB2 FB3 FB4: "Ferrite Beads Multi-Layer 120Ohm 25% 100MHz 2A 45mOhm DCR 0603 Automotive T/R", Case Code (Imperial)=0603, Case Code (Metric)=1608, DC Resistance (DCR)=45mR, Manufacturer=TDK, Max Current Rating=2A, Max Operating Temperature=125°C, Min Operating Temperature=-55°C, Package Quantity=4000, Ratings=AEC-Q200, Supplier Part Number 1=445-172891-6-ND, Test Frequency=100MHz, Tolerance=25%, Case/Package=0603, Category="Ferrite Beads and Chips", ComponentLink1Description=https://media.digikey.com/pdf/Data%20Sheets/TDK%20PDFs/MPZ_Series_Br.pdf?src-supplier=Digi-Key, ComponentLink1URL=https://media.digikey.com/pdf/Data%20Sheets/TDK%20PDFs/MPZ_Series_Br.pdf?src-supplier=Digi-Key, ComponentLink2Description=http://www.mouser.com/ds/2/400/eads_commercial_power_mpz1608_en-923650.pdf?src-supplier=Mouser, ComponentLink2URL=http://www.mouser.com/ds/2/400/eads_commercial_power_mpz1608_en-923650.pdf?src-supplier=Mouser, ComponentLink3Description=https://product.tdk.com/info/en/catalog/datasheets/beads_automotive_power_mpz1608_en.pdf?src-supplier=Digi-Key, ComponentLink3URL=https://product.tdk.com/info/en/catalog/datasheets/beads_automotive_power_mpz1608_en.pdf?src-supplier=Digi-Key, Height=0.03inch, Impedance=120R, Length=0.063inch, Manufacturer Part Number=MPZ1608S121ATDH5, Max DC Current=2A, Mount="Surface Mount", Number of Lines=1, Packaging="Tape and Reel", Pricing 1="1=0.11000, 10=0.08600, 25=0.07720, 50=0.05660, 100=0.04890, 250=0.03860, 500=0.03260, 1000=0.02746 (USD)", RoHS=Yes, RoHS Compliant=Yes, Supplier 1=Digi-Key, Termination=SMD/SMT, Weight=7.1E-05oz, Width=0.031inch
J1: "USB 3.0 3A 1 Brick nogging 24 Female -35℃~+75℃ Type-C SMD USB Connectors ROHS", Manufacturer=SOFNG, ComponentLink1Description=LCSC, ComponentLink1URL=https://www.lcsc.com/product-detail/USB-Connectors_SOFNG-MC-318FB_C2977724.html, Manufacturer Part Number=MC-318FB
J2 J5: "CONN MOD JACK 8P8C VERT UNSHLD", Current Rating=1.5A, Manufacturer=Molex, Manufacturer Part Number=85511-5001, Max Operating Temperature=80°C, Min Operating Temperature=-40°C, Package Quantity=2618, Supplier Part Number 1=538-85511-5001, Voltage Rating=125V, Category="Modular / Ethernet Connectors", ComponentLink1Description=https://datasheet.ciiva.com/8042/1598510-8042692.pdf?src-supplier=Element14, ComponentLink1URL=https://datasheet.ciiva.com/8042/1598510-8042692.pdf?src-supplier=Element14, ComponentLink2Description=https://datasheet.ciiva.com/34305/0855115001-modular-jacks-plug-34305578.pdf?src-supplier=Onlinecomponents.com, ComponentLink2URL=https://datasheet.ciiva.com/34305/0855115001-modular-jacks-plug-34305578.pdf?src-supplier=Onlinecomponents.com, ComponentLink3Description=https://datasheet.ciiva.com/4562/0855115001-modular-jacks-plug-175812-4562506.pdf?src-supplier=Mouser, ComponentLink3URL=https://datasheet.ciiva.com/4562/0855115001-modular-jacks-plug-175812-4562506.pdf?src-supplier=Mouser, ComponentLink4Description=https://datasheet.ciiva.com/9392/0855115001-modular-jacks-plug-9392966.pdf?src-supplier=Avnet, ComponentLink4URL=https://datasheet.ciiva.com/9392/0855115001-modular-jacks-plug-9392966.pdf?src-supplier=Avnet, Connector Type=PCB, Contact Material=Bronze, Contact Plating=Gold, Gender=Female, Housing Material=Thermoplastic, Item Type="Ethernet Connector", Mounting Technology="Through Hole", Number of Contacts=8, Number of Ports=1, Number of Positions=8, Orientation=Straight, Packaging=Tray, Pitch=2.54mm, Pricing 1="1=2.18, 10=1.62, 50=1.62, 100=1.56, 1000=1.37, 10000=1.36 (USD)", Radiation Hardening=No, Reach SVHC Compliant=Unknown, RoHS=Yes, RoHS Compliant=Yes, Series=85511, Shielding=Unshielded, Stock 1=2609, Supplier 1=Mouser, Termination="Through Hole"
J3: "CONN HEADER SMD 26POS 1.27MM", Manufacturer=Harwin, Supplier Part Number 1=952-3878-1-ND, Category=Connectors, Manufacturer Part Number=M55-7012642R, Pricing 1="1=1.43000, 10=1.24900, 100=1.11570 (USD)", RoHS=Yes, RoHS Compliant=Yes, Stock 1=384, Supplier 1=Digi-Key
J4: "CONN HEADER VERT 4POS 2.5MM", Color=Natural, Contact Resistance=20mR, Current Rating=3A, Housing Color=White, Insulation Resistance=1GR, Manufacturer=JST, Max Operating Temperature=85°C, Max Voltage Rating (AC)=250V, Min Operating Temperature=-25°C, Package Quantity=500, Supplier Part Number 1=8134090, Category="FFC / FPC", ComponentLink1Description=https://datasheet.ciiva.com/26894/getdatasheetpartid-455616-26894787.pdf?src-supplier=Verical, ComponentLink1URL=https://datasheet.ciiva.com/26894/getdatasheetpartid-455616-26894787.pdf?src-supplier=Verical, ComponentLink2Description=https://datasheet.ciiva.com/26924/getdatasheetpartid-640571-26924035.pdf?src-supplier=Verical, ComponentLink2URL=https://datasheet.ciiva.com/26924/getdatasheetpartid-640571-26924035.pdf?src-supplier=Verical, ComponentLink3Description=https://datasheet.ciiva.com/16203/b4b-xh-alfsn-16203642.pdf?src-supplier=Future+Electronics, ComponentLink3URL=https://datasheet.ciiva.com/16203/b4b-xh-alfsn-16203642.pdf?src-supplier=Future+Electronics, ComponentLink4Description=https://datasheet.ciiva.com/726/exh-726404.pdf?src-supplier=Digi-Key, ComponentLink4URL=https://datasheet.ciiva.com/726/exh-726404.pdf?src-supplier=Digi-Key, Connector Type="Male Pin", Contact Material=Brass, Contact Plating=Tin,Copper,Lead, Depth=5.75mm, Gender=Male, Housing Material=Polyamide, Lead Free="Lead Free", Lead Pitch=2.5mm, Length=12.4mm, Manufacturer Part Number=B4B-XH-A(LF)(SN), Material=Polyamide, Max Current Rating=3A, Max Voltage Rating (DC)=250V, Mount="Through Hole", Number of Contacts=4, Number of Positions=4, Number of Rows=1, Orientation=Straight, Packaging=Bulk, Pitch=2.5mm, Pricing 1="1=0.13000, 300=0.11300, 1000=0.11000, 3000=0.10700, 10000=0.10400 (USD)", REACH SVHC="No SVHC", RoHS=Yes, Supplier 1="Future Electronics", Termination=Press-Fit, Voltage Rating=250V, Voltage Rating (AC)=250V, Wire/Cable Gauge=22AWG
J6: "CONN HEADER SMD 3POS 1.25MM", Manufacturer=Molex, Supplier Part Number=538-53398-0367, ComponentLink1Description=https://datasheet.ciiva.com/2944/533980367-sd-2944045.pdf?src-supplier=Digi-Key, ComponentLink1URL=https://datasheet.ciiva.com/2944/533980367-sd-2944045.pdf?src-supplier=Digi-Key, Manufacturer Part Number=0533980367, Pricing="1=1.41, 10=1.16, 50=1.16, 100=0.963, 1000=0.77, 10000=0.625 (USD)", RoHS=Yes, Stock=6777, Supplier=Mouser
J11: "CONN HEADER VERT 4POS 3.96MM", Manufacturer=JST, Supplier Part Number 1=4271011, Category=Connectors, ComponentLink1Description=https://datasheet.ciiva.com/16292/b4p-vh-fb-blfsn-16292309.pdf?src-supplier=Future+Electronics, ComponentLink1URL=https://datasheet.ciiva.com/16292/b4p-vh-fb-blfsn-16292309.pdf?src-supplier=Future+Electronics, Lead Free="Lead Free", Manufacturer Part Number=B4P-VH-FB-B(LF)(SN), Mount="Through Hole", Number of Positions=4, Pitch=3.96mm, Pricing 1="1=0.22000, 200=0.19300, 500=0.18800, 2000=0.18200, 5000=0.17800 (USD)", RoHS=Yes, Supplier 1="Future Electronics", Termination=Crimp
L1: library part SLF12575T-221M1R3-PF, "Inductor Power Shielded Wirewound 220uH 20% 1KHz Ferrite 1.3A 310mOhm DCR Blister T/R", Case/Package=Nonstandard, Current Rating=1.3A, DC Resistance (DCR)=310mR, Manufacturer=TDK, Max Operating Temperature=105°C, Min Operating Temperature=-20°C, Package Quantity=500, Resistor Type=Wirewound, Supplier Part Number 1=445-174412-1-ND, Test Frequency=1kHz, Tolerance=20%, Category="Fixed Inductors", ComponentLink1Description=https://datasheet.ciiva.com/11802/0900766b812b7d4f-11802208.pdf?src-supplier=RSComponents, ComponentLink1URL=https://datasheet.ciiva.com/11802/0900766b812b7d4f-11802208.pdf?src-supplier=RSComponents, Core Material=Ferrite, DC Current=1.3A, Depth=12.8mm, Height=0.295inch, Height - Seated (Max)=0.309inch, Inductance=220uH, Lead Free="Lead Free", Length=12.5mm, Manufacturer Part Number=SLF12575T-221M1R3-PF, Max DC Current=1.3A, Military Standard=Not, Mount="Surface Mount", Packaging="Tape and Reel", Pricing 1="1=1.97000, 10=1.81500, 25=1.66360, 50=1.42180, 100=1.27050, 250=1.08900 (USD)", RoHS=Yes, RoHS Compliant=Yes, Saturation Current=1.3A, Series=SLF, Shielding=Shielded, Stock 1=1079, Supplier 1=Digi-Key, Termination=SMD/SMT, Width=12.5mm
L2: library part PNLS5020-330, "1A 33uH ±20% 356mΩ SMD,5x5x2mm Power Inductors ROHS", Manufacturer=DMBJ, ComponentLink1Description=LCSC, ComponentLink1URL=https://www.lcsc.com/product-detail/Power-Inductors_DMBJ-PNLS5020-330_C2849490.html, Manufacturer Part Number=PNLS5020-330
L3: library part FNR3015S3R9MT, "1.5A 3.9uH ±20% 1.4A SMD,3x3mm Power Inductors ROHS", LCSC Part Number=C167751, Manufacturer=cjiang, Package=SMD,3x3mm, ComponentLink1Description=LCSC, ComponentLink1URL=https://www.lcsc.com/product-detail/Power-Inductors_cjiang-Changjiang-Microelectronics-Tech-FNR3015S3R9MT_C167751.html, Item Type=Inductor, Manufacturer Part Number=FNR3015S3R9MT
LED1: "Standard LEDs - SMD SMD LED Red/Grn/Blue 625/1550/260 mcd", Case/Package=PLCC, Color=Blue,Green,Red, Forward Current=20mA, Forward Voltage=3.8V, Manufacturer="Vishay Lite-On", Max Operating Temperature=85°C, Min Operating Temperature=-40°C, Package Quantity=2000, Reverse Voltage=5V, Supplier Part Number 1=859-LTST-G683GEBW, Category=LEDs, ComponentLink1Description=https://datasheet.ciiva.com/2959/s-110-ltst-g683gebw-2959963.pdf?src-supplier=Digi-Key, ComponentLink1URL=https://datasheet.ciiva.com/2959/s-110-ltst-g683gebw-2959963.pdf?src-supplier=Digi-Key, ComponentLink2Description=https://datasheet.ciiva.com/12403/s-110-ltst-g683gebw-337108-12403142.pdf?src-supplier=Mouser, ComponentLink2URL=https://datasheet.ciiva.com/12403/s-110-ltst-g683gebw-337108-12403142.pdf?src-supplier=Mouser, Depth=3.2mm, Dominant Wavelength=525nm, Height=1.45mm, Lead Free="Lead Free", Length=3.3mm, Lens Style=Diffused,Circular, Lens Transparency=Diffused, Luminous Intensity=267.5mcd, Manufacturer Part Number=LTST-G683GEBW, Mount="Surface Mount", Number of Elements=3, Number of LEDs=3, Number of Pins=6, Packaging="Tape and Reel", Pricing 1="1=0.51000, 10=0.46000, 50=0.46000, 100=0.34600, 500=0.29900, 1000=0.23600, 2000=0.21200, 10000=0.20900, 24000=0.20400, 50000=0.19700 (USD)", Radiation Hardening=No, RoHS=Yes, RoHS Compliant=Yes, Series=-, Stock 1=43790, Supplier 1=Mouser, Test Current=20mA, Viewing Angle=120°, Width=3mm
P1 P2: "XT60 Connector Male-Female Pair, Black (Pololu)", Manufacturer=Polulo, Package=Custom, Item Type="Power Connector", Manufacturer Part Number=2158
P3 P4 P5 P6: library part "TEST POINT", "Test Point ON"
Q1 Q2 Q3 Q4: "40V 6A 25mΩ@10V,6A 1.9W 1.6V@250uA 76pF@15V 2 N-Channel 1.013nF@15V 9.8nC@4.5V -55℃~+150℃@(Tj) SOP-8 MOSFETs ROHS", Manufacturer=MSKSEMI, ComponentLink1Description=LCSC, ComponentLink1URL=https://www.lcsc.com/product-detail/MOSFETs_MSKSEMI-AO4882-MS_C2847038.html, Manufacturer Part Number=AO4882-MS
Q5: "MOSFET P CH 60V 10A DPAK", LCSC Part Number=C457501, Manufacturer=STMicroelectronics, Supplier Part Number=511-STD10P6F6, Category=MOSFETs, ComponentLink1Description=https://datasheet.ciiva.com/13063/dm00051198-211735-13063452.pdf?src-supplier=Mouser, ComponentLink1URL=https://datasheet.ciiva.com/13063/dm00051198-211735-13063452.pdf?src-supplier=Mouser, ComponentLink2Description=https://datasheet.ciiva.com/6380/dm00051198-6380394.pdf?src-supplier=Digi-Key, ComponentLink2URL=https://datasheet.ciiva.com/6380/dm00051198-6380394.pdf?src-supplier=Digi-Key, ComponentLink3Description=https://datasheet.ciiva.com/6380/dm00051198-6380397.pdf?src-supplier=Digi-Key, ComponentLink3URL=https://datasheet.ciiva.com/6380/dm00051198-6380397.pdf?src-supplier=Digi-Key, ComponentLink4Description=https://datasheet.ciiva.com/16220/dm00051198-16220460.pdf?src-supplier=Future+Electronics, ComponentLink4URL=https://datasheet.ciiva.com/16220/dm00051198-16220460.pdf?src-supplier=Future+Electronics, Item Type=MOSFET, Manufacturer Part Number=STD10P6F6, Pricing="1=1.13, 10=1.01, 50=1.01, 100=0.783, 500=0.647, 1000=0.511, 2500=0.477, 10000=0.477 (USD)", RoHS=Yes, Stock=73, Supplier=Mouser